# EAGLE board tssop14_breakout (EAGLE 9.6.2)
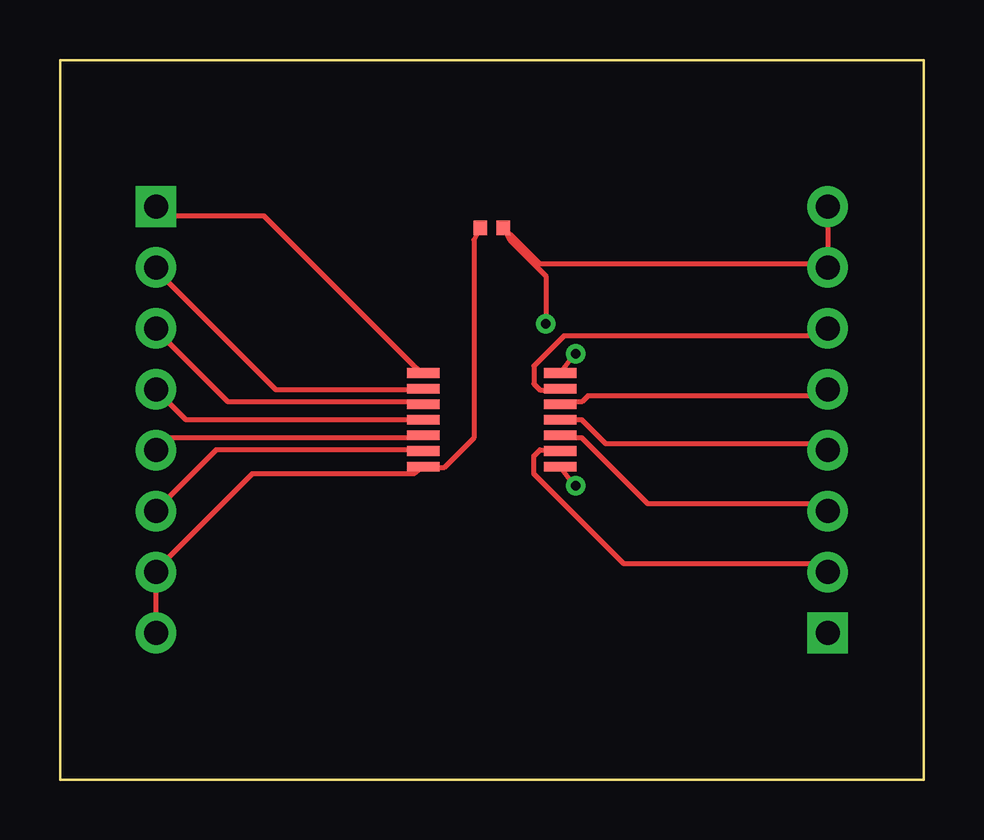
[diagram p0: board, top side]
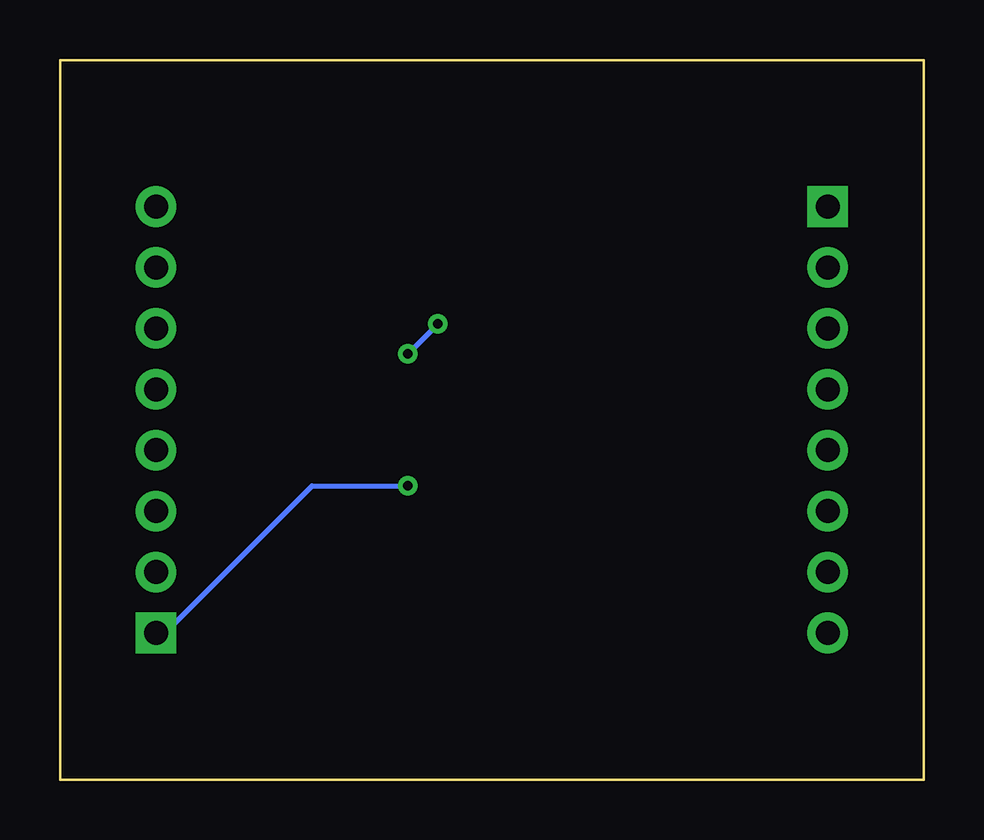
[diagram p1: board, bottom side, seen from below]

Size 36 x 30 mm. Coordinates in mm from the lower left corner, seen from the top.
Outline: 0,0 36,0 36,30 0,30 0,0
Copper layers used: Top, Bottom
Design rules "eh3d-kit": minimum track width 0.15mm, minimum drill 0.3mm, track to track 0.15mm, track to pad 0.15mm, pad to pad 0.15mm, via to via 0.15mm, smd to smd 0.15mm, copper to edge 0.3mm, drill to drill 0.25mm, minimum pad ring 0.15mm, minimum via ring 0.15mm

## Footprints (pad centres in the part's own frame; a part is rotated, then mirrored left to right if it is on the bottom)
CHIP-0402 = smd 0.56 x 0.62: 1 -0.48,0; 2 0.48,0
HDR-1X08 = drill 1 pad 1.7 square: 1 -8.89,0 | drill 1 pad 1.7: 2 -6.35,0; 3 -3.81,0; 4 -1.27,0; 5 1.27,0; 6 3.81,0; 7 6.35,0; 8 8.89,0
TSSOP-14 = smd 1.35 x 0.4: 1 -2.85,1.95; 2 -2.85,1.3; 3 -2.85,0.65; 4 -2.85,0; 5 -2.85,-0.65; 6 -2.85,-1.3; 7 -2.85,-1.95; 8 2.85,-1.95; 9 2.85,-1.3; 10 2.85,-0.65; 11 2.85,0; 12 2.85,0.65; 13 2.85,1.3; 14 2.85,1.95

## Placement (x,y rotation side)
C1  100n  [CHIP-0402]  18,23 0 top
J1  LEFT  [HDR-1X08]  4,15 270 top
J2  RIGHT  [HDR-1X08]  32,15 90 top
U1  GENERIC14  [TSSOP-14]  18,15 0 top

## Library data of the parts
C1 J1 J2 U1 = eh3d-kit

## Nets
GND: C1.1 J1.7 J1.8 U1.7
P1: J1.1 U1.1
P2: J1.2 U1.2
P3: J1.3 U1.3
P4: J1.4 U1.4
P5: J1.5 U1.5
P6: J1.6 U1.6
P8: J2.1 U1.8
P9: J2.2 U1.9
P10: J2.3 U1.10
P11: J2.4 U1.11
P12: J2.5 U1.12
P13: J2.6 U1.13
VCC: C1.2 J2.7 J2.8 U1.14

## Tracks (layer width: path | path; a pad name or v marks a point on that pad's centre or on a via)
GND
  Top 0.2: J1.8 J1.7 4.5,9.25 8,12.75 14.75,12.75 U1.7 15.75,13 16,13 17.25,14.25 17.25,22.5 C1.1
P1
  Top 0.2: U1.1 14.75,17.25 8.5,23.5 4.5,23.5 J1.1
P2
  Top 0.2: U1.2 14.75,16.25 9,16.25 4.5,20.75 J1.2
P3
  Top 0.2: U1.3 14.75,15.75 7,15.75 4.5,18.25 J1.3
P4
  Top 0.2: U1.4 5.25,15 4.5,15.75 J1.4
P5
  Top 0.2: U1.5 14.75,14.25 4.5,14.25 J1.5
P6
  Top 0.2: U1.6 14.75,13.75 6.5,13.75 4.5,11.75 J1.6
P8  (via drill 0.4 pad 0.8)
  Top 0.2: v21.5,12.25 21.25,12.5 U1.8
  Bottom 0.2: J2.1 31.5,6.25 25.5,12.25 v21.5,12.25
P9
  Top 0.2: J2.2 31.5,9 23.5,9 19.75,12.75 19.75,13.5 20,13.75 20.25,13.75 U1.9
P10
  Top 0.2: J2.3 31.5,11.5 24.5,11.5 21.75,14.25 21.25,14.25 U1.10
P11
  Top 0.2: J2.4 31.5,14 22.75,14 21.75,15 U1.11
P12
  Top 0.2: J2.5 31.5,16 22,16 21.75,15.75 21.25,15.75 U1.12
P13
  Top 0.2: J2.6 31.5,18.5 21,18.5 19.75,17.25 19.75,16.5 20,16.25 20.25,16.25 U1.13
VCC  (via drill 0.4 pad 0.8)
  Top 0.2: v20.25,19 20.25,21 18.75,22.5 C1.2 19,22.5 20,21.5 31.5,21.5 J2.7 J2.8 | v21.5,17.75 21.25,17.5 U1.14
  Bottom 0.2: v20.25,19 v21.5,17.75